# Altium PCB BOARD_4LAYER.PcbDoc (part 19 of 21)
Units mil, origin at the board's own origin, x right, y up, seen from the top; angles counter-clockwise.
Board outline 6692.91 x 10039.37 mil, 4 copper layers (Top Layer, Mid Layer 1, Mid Layer 2, Bottom Layer), stack 66.299 mil thick; 1532 components, 908 nets, 4105 pads, 1286 vias.
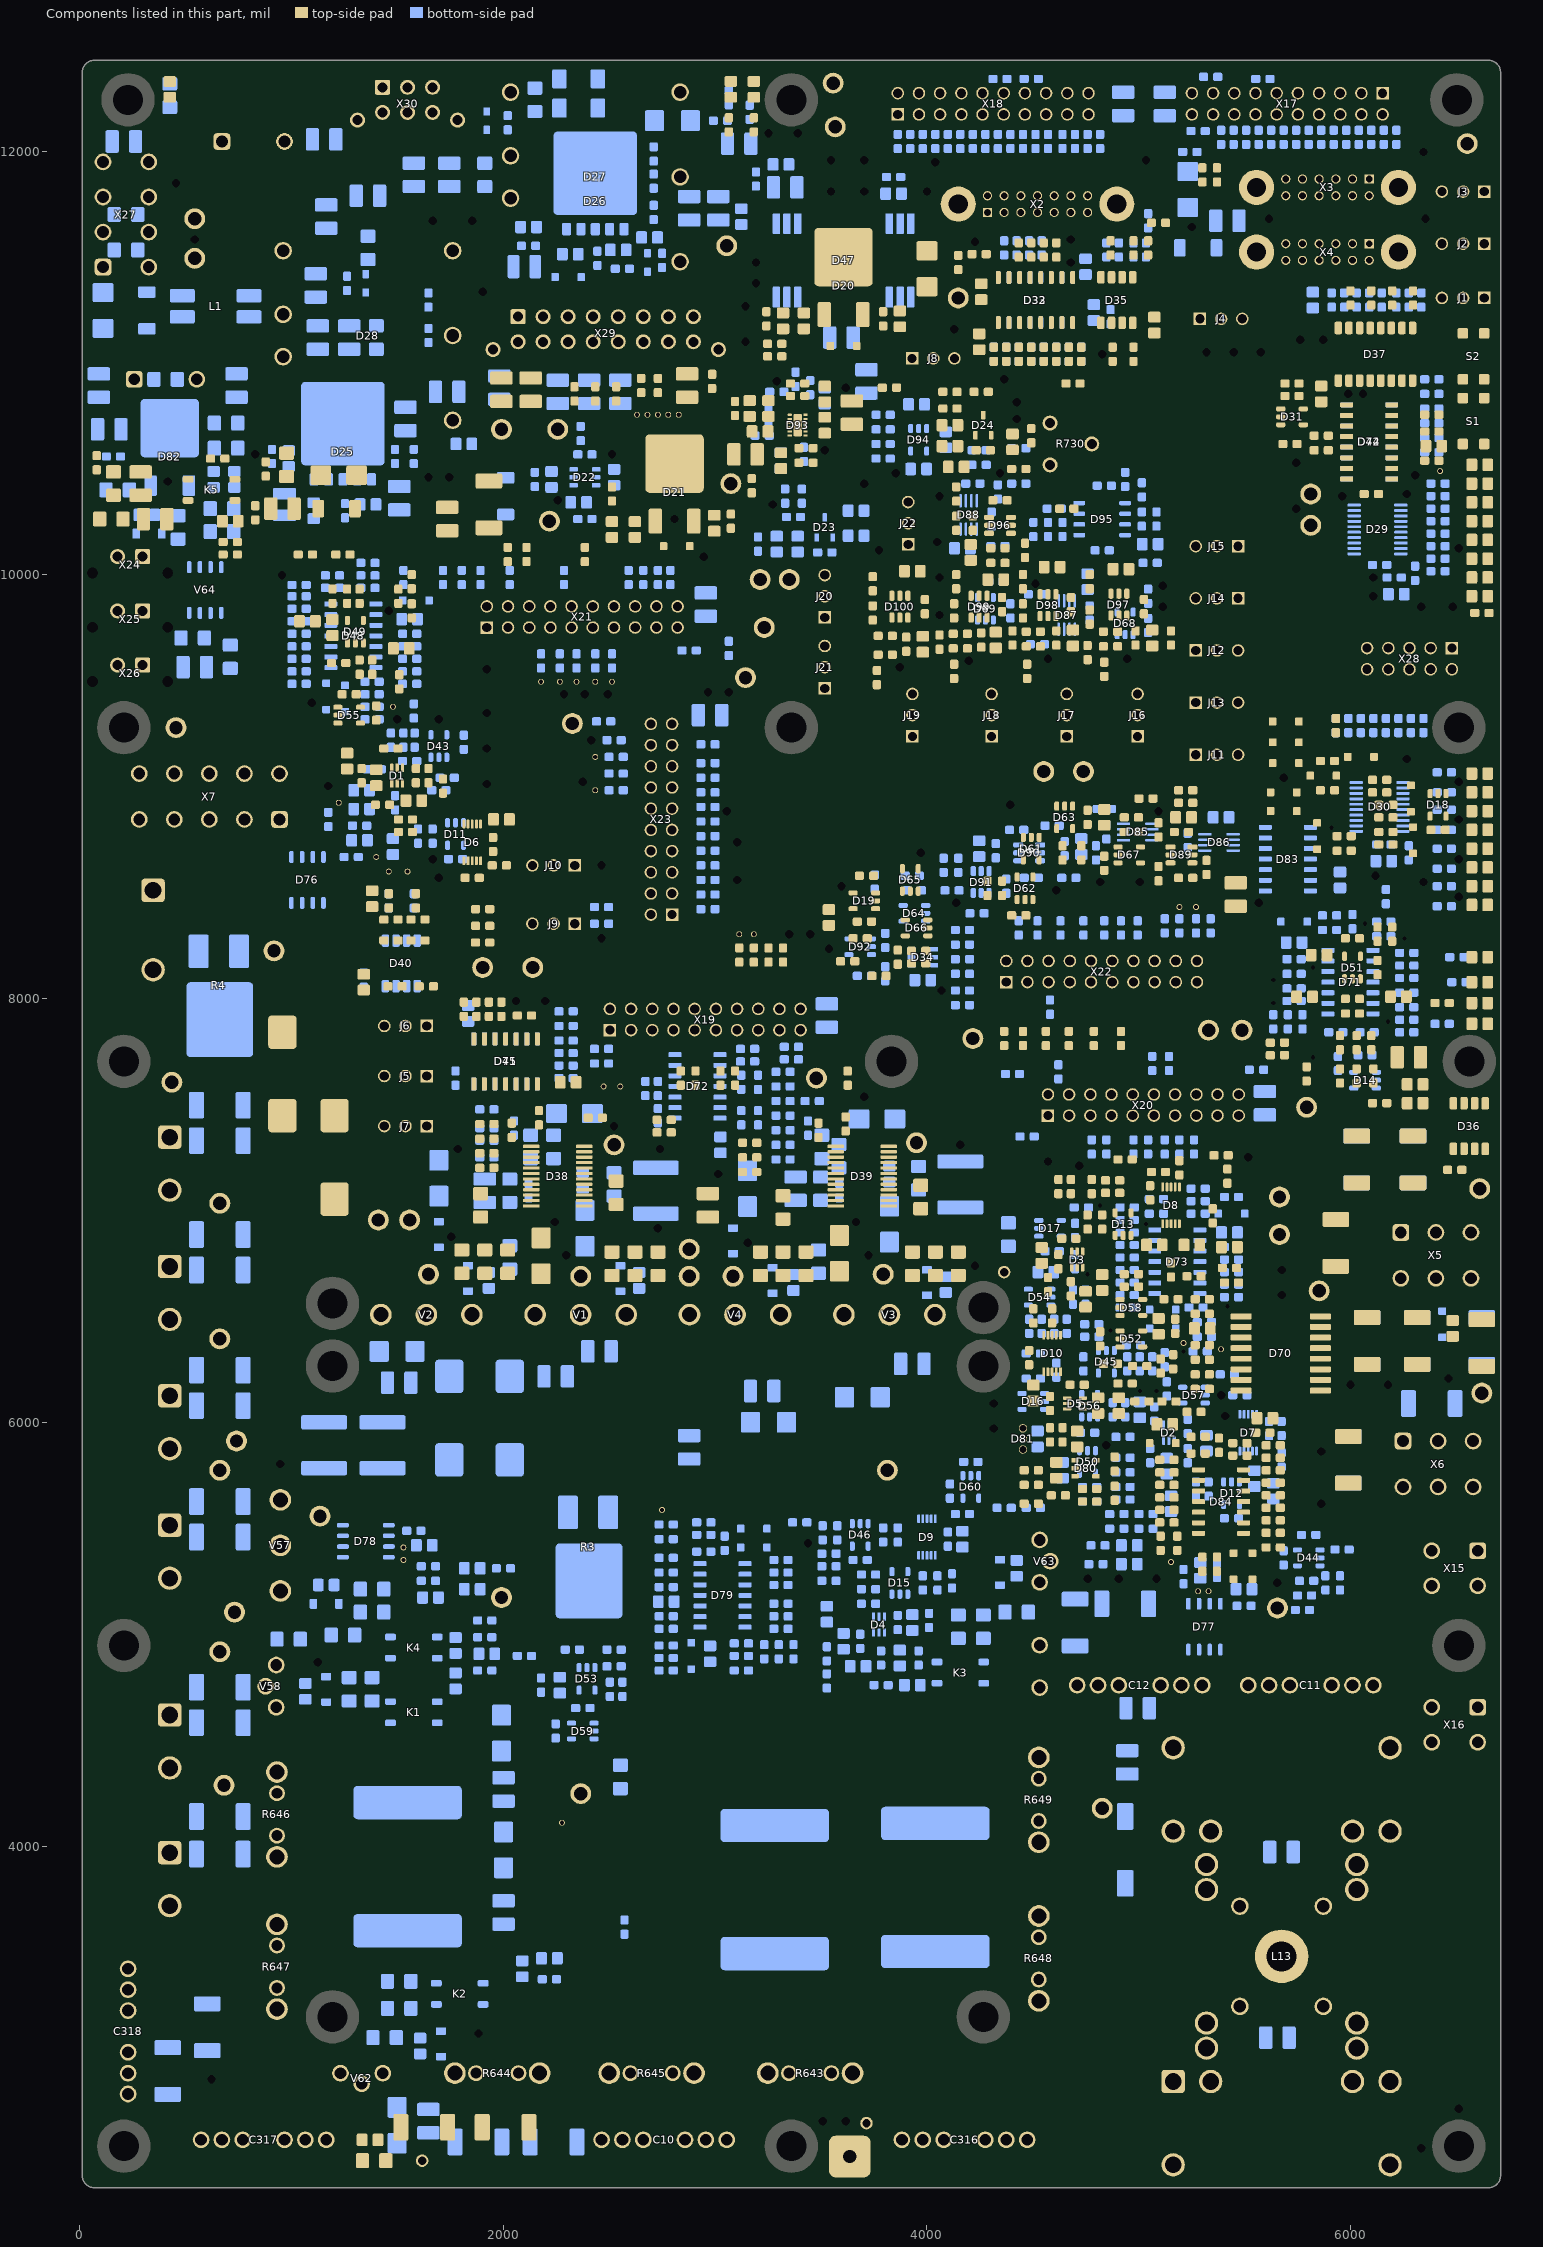
[diagram p21: the components of this part, seen from the top]

## Polygon pours and split planes (outlines as drawn) (continued)
$2N2408 on Mid Layer 2 "$2N2408_L-01_P176" (solid, remove dead copper, pour order 176): 3891.73,5706.69 2592.52,5706.69 2592.52,5500 2405.51,5500 2405.51,5706.69 2297.24,5706.69 2297.24,6612.2 2435.04,6612.2 2435.04,5844.49 3763.78,5844.49 3763.78,6612.2 3891.73,6612.2
$2N2408 on Mid Layer 2 "$2N2408_L-01_P168" (solid, remove dead copper, pour order 168): 3744.09,6612.2 3842.52,6612.2 3842.52,6700.79 3744.09,6700.79
$2N2408 on Mid Layer 2 "$2N2408_L-01_P164" (solid, remove dead copper, pour order 164): 3842.52,6661.42 3891.73,6612.2 3842.52,6612.2
$2N2408 on Mid Layer 2 "$2N2408_L-01_P163" (solid, remove dead copper, pour order 163): 3744.09,6612.2 3763.78,6592.52 3763.78,6612.2
U_TS on Mid Layer 2 "U_TS_L-01_P155" (solid, remove dead copper, pour order 155): 6175.2,5637.8 6332.68,5637.8 6332.68,5933.07 6175.2,5933.07
U_TS on Mid Layer 2 "U_TS_L-01_P150" (solid, remove dead copper, pour order 150): 5761.81,6070.87 5919.29,6070.87 5919.29,6307.09 5761.81,6307.09
U_Fin on Mid Layer 2 "U_FIN_L-01_P147" (solid, remove dead copper, pour order 147): 6155.51,6661.42 6312.99,6661.42 6312.99,7015.75 6155.51,7015.75
U_Fin on Mid Layer 2 "U_FIN_L-01_P141" (solid, remove dead copper, pour order 141): 5919.29,6346.46 5761.81,6346.46 5761.81,6681.1 5860.24,6779.53 5919.29,6779.53
U_Fin on Mid Layer 2 "U_FIN_L-01_P140" (solid, remove dead copper, pour order 140): 5919.29,6661.42 6155.51,6661.42 6155.51,6779.53 5919.29,6779.53
~U_TS on Mid Layer 2 "~U_TS_L-01_P134" (solid, remove dead copper, pour order 134): 6529.53,5637.8 6687.01,5637.8 6687.01,6287.4 6529.53,6287.4
~U_Fin on Mid Layer 2 "~U_FIN_L-01_P130" (solid, remove dead copper, pour order 130): 6509.84,6464.57 6687.01,6464.57 6687.01,7212.6 6509.84,7212.6
+U_POWER on Mid Layer 2 "+U_POWER_L-01_P128" (solid, remove dead copper, pour order 128): 614.17,5027.56 801.18,5027.56 801.18,7576.77 614.17,7576.77
+U_POWER on Mid Layer 2 "+U_POWER_L-01_P124" (solid, remove dead copper, pour order 124): 1273.62,4003.94 1844.49,4003.94 1844.49,4338.58 1273.62,4338.58
$6N134 on Mid Layer 2 "$6N134_L-01_P117" (solid, remove dead copper, pour order 117): 1372.05,2744.09 860.24,2744.09 860.24,3393.7 1017.72,3393.7 1017.72,2842.52 1372.05,2842.52
$6N134 on Mid Layer 2 "$6N134_L-01_P114" (solid, remove dead copper, pour order 114): 643.7,3846.46 978.35,3846.46 978.35,4122.05 643.7,4122.05
$6N134 on Mid Layer 2 "$6N134_L-01_P113" (solid, remove dead copper, pour order 113): 643.7,3216.54 761.81,3216.54 761.81,3846.46 643.7,3846.46
$6N134 on Mid Layer 2 "$6N134_L-01_P112" (solid, remove dead copper, pour order 112): 761.81,3216.54 860.24,3216.54 860.24,3393.7 761.81,3393.7
$6N135 on Mid Layer 2 "$6N135_L-01_P104" (solid, remove dead copper, pour order 104): 2326.77,3708.66 2435.04,3708.66 2435.04,3944.88 2326.77,3944.88
$6N135 on Mid Layer 2 "$6N135_L-01_P101" (solid, remove dead copper, pour order 101): 1175.2,3472.44 860.24,3472.44 860.24,3748.03 1057.09,3748.03 1057.09,4200.79 801.18,4200.79 801.18,4338.58 653.54,4486.22 653.54,4811.02 919.29,4811.02 919.29,4712.6 840.55,4712.6 840.55,4476.38 1175.2,4476.38
$6N135 on Mid Layer 2 "$6N135_L-01_P096" (solid, remove dead copper, pour order 96): 1175.2,3472.44 1844.49,3472.44 1844.49,3846.46 1175.2,3846.46
$6N3156 on Mid Layer 2 "$6N3156_L-01_P081" (solid, remove dead copper, pour order 81): 3616.14,3885.83 2927.17,3885.83 2927.17,3059.06 3025.59,3059.06 3025.59,2862.2 2750,2862.2 2750,3925.2 3064.96,4240.16 3616.14,4240.16
$6N3156 on Mid Layer 2 "$6N3156_L-01_P077" (solid, remove dead copper, pour order 77): 2927.17,3059.06 3734.25,3059.06 3734.25,3118.11 2927.17,3118.11
$6N3156 on Mid Layer 2 "$6N3156_L-01_P073" (solid, remove dead copper, pour order 73): 2021.65,2881.89 2277.56,2881.89 2277.56,3137.8 2021.65,3137.8
$6N3156 on Mid Layer 2 "$6N3156_L-01_P070" (solid, remove dead copper, pour order 70): 3498.03,2842.52 3734.25,2842.52 3734.25,3059.06 3498.03,3059.06
$6N3156 on Mid Layer 2 "$6N3156_L-01_P067" (solid, remove dead copper, pour order 67): 2750,3137.8 2021.65,3137.8 2120.08,3236.22 2750,3236.22
$6N106 on Mid Layer 2 "$6N106_L-01_P065" (solid, remove dead copper, pour order 65): 18 vertices, not listed, extent 1411.42,2566.93 3399.61,3059.06
$6N106 on Mid Layer 2 "$6N106_L-01_P055" (solid, remove dead copper, pour order 55): 929.13,4604.33 1096.46,4604.33 1096.46,4712.6 929.13,4712.6
$6N3315 on Mid Layer 2 "$6N3315_L-01_P050" (solid, remove dead copper, pour order 50): 21 vertices, not listed, extent 4364.17,3196.85 4718.5,5401.57
+U_AMP on Mid Layer 2 "+U_AMP_L-01_P042" (solid, remove dead copper, pour order 42): 6293.31,4633.86 6687.01,4633.86 6687.01,4771.65 6293.31,4771.65
+U_AMP on Mid Layer 2 "+U_AMP_L-01_P039" (solid, remove dead copper, pour order 39): 6175.2,5362.2 6687.01,5362.2 6687.01,5480.31 6175.2,5480.31
$6N94 on Mid Layer 2 "$6N94_L-01_P034" (solid, remove dead copper, pour order 34): 5564.96,2842.52 4856.3,2842.52 4856.3,3472.44 5427.17,3472.44 5427.17,3314.96 5564.96,3314.96
$6N94 on Mid Layer 2 "$6N94_L-01_P030" (solid, remove dead copper, pour order 30): 4127.95,2409.45 3812.99,2409.45 3812.99,3196.85 3025.59,3196.85 3025.59,3688.98 3616.14,3688.98 3616.14,3295.28 3911.42,3295.28 3911.42,2763.78 4127.95,2763.78
$6N101 on Mid Layer 2 "$6N101_L-01_P026" (solid, remove dead copper, pour order 26): 5722.44,4673.23 5584.65,4535.43 5584.65,3669.29 5486.22,3669.29 5486.22,3590.55 4856.3,3590.55 4856.3,3925.2 5072.83,3925.2 5072.83,4555.12 5427.17,4555.12 5427.17,4771.65 5722.44,4771.65
$6N737 on Mid Layer 2 "$6N737_L-01_P019" (solid, remove dead copper, pour order 19): 6687.01,2803.15 6293.31,2803.15 6293.31,2409.45 5742.13,2409.45 5742.13,3295.28 5879.92,3295.28 5879.92,3472.44 6687.01,3472.44
$6N737 on Mid Layer 2 "$6N737_L-01_P015" (solid, remove dead copper, pour order 15): 4777.56,2507.87 4226.38,2507.87 4226.38,2842.52 3990.16,2842.52 3990.16,3374.02 3753.94,3374.02 3753.94,3629.92 4324.8,3629.92 4324.8,3374.02 4088.58,3374.02 4088.58,2980.32 4777.56,2980.32
-U_AMP on Mid Layer 2 "-U_AMP_L-01_P010" (solid, remove dead copper, pour order 10): 6687.01,3590.55 5879.92,3590.55 5879.92,3669.29 5761.81,3669.29 5761.81,4437.01 5840.55,4515.75 5840.55,4771.65 6135.83,4771.65 6135.83,4515.75 6687.01,4515.75
-U_AMP on Mid Layer 2 "-U_AMP_L-01_P002" (solid, remove dead copper, pour order 2): 6312.99,5125.98 6687.01,5125.98 6687.01,5263.78 6312.99,5263.78
$2N5063 on Top Layer "$2N5063_L01_P642" (solid, remove dead copper, pour order 642): 2356.3,4131.89 2917.32,4692.91 2356.3,4692.91
$2N5063 on Top Layer "$2N5063_L01_P641" (solid, remove dead copper, pour order 641): 29 vertices, not listed, extent 1411.42,4082.68 4413.39,6110.24
$2N5063 on Top Layer "$2N5063_L01_P640" (solid, remove dead copper, pour order 640): 2169.29,3649.61 2267.72,3649.61 2267.72,4082.68 2169.29,4082.68
$2N5063 on Top Layer "$2N5063_L01_P639" (solid, remove dead copper, pour order 639): 2169.29,3226.38 2474.41,3226.38 2474.41,3649.61 2169.29,3649.61
GND_UM on Top Layer "GND_UM_L01_P638" (solid, remove dead copper, pour order 638): 4728.35,10076.77 5151.57,10076.77 5151.57,10578.74 4728.35,10578.74
GND_UM on Top Layer "GND_UM_L01_P637" (solid, remove dead copper, pour order 637): 3812.99,11316.93 3921.26,11316.93 3921.26,11838.58 3812.99,11838.58
GND_UM on Top Layer "GND_UM_L01_P633" (solid, remove dead copper, pour order 633): 5653.54,11602.36 6293.31,11602.36 6293.31,11750 5653.54,11750
GND_UM on Top Layer "GND_UM_L01_P632" (solid, remove dead copper, pour order 632): 5072.83,11336.61 5171.26,11336.61 5171.26,11622.05 5072.83,11622.05
GND_UM on Top Layer "GND_UM_L01_P631" (solid, remove dead copper, pour order 631): 5653.54,11149.61 5909.45,11149.61 5909.45,11444.88 5653.54,11444.88
GND_UM on Top Layer "GND_UM_L01_P630" (solid, remove dead copper, pour order 630): 5259.84,11730.32 5417.32,11730.32 5417.32,11779.53 5259.84,11779.53
GND_UM on Top Layer "GND_UM_L01_P629" (solid, remove dead copper, pour order 629): 5417.32,11730.32 5653.54,11730.32 5653.54,11907.48 5417.32,11907.48
GND_UM on Top Layer "GND_UM_L01_P628" (solid, remove dead copper, pour order 628): 5171.26,11336.61 5653.54,11336.61 5653.54,11730.32 5171.26,11730.32
GND_UM on Top Layer "GND_UM_L01_P627" (solid, remove dead copper, pour order 627): 5200.79,11730.32 5259.84,11730.32 5259.84,11956.69 5200.79,11956.69
GND_UM on Top Layer "GND_UM_L01_P626" (solid, remove dead copper, pour order 626): 5417.32,11907.48 6244.09,11907.48 6244.09,11956.69 5417.32,11956.69
GND_UM on Top Layer "GND_UM_L01_P625" (solid, remove dead copper, pour order 625): 5200.79,11956.69 6244.09,11956.69 6244.09,12114.17 5200.79,12114.17
GND_UM on Top Layer "GND_UM_L01_P624" (solid, remove dead copper, pour order 624): 3921.26,11602.36 4246.06,11602.36 4246.06,11838.58 3921.26,11838.58
GND_UM on Top Layer "GND_UM_L01_P623" (solid, remove dead copper, pour order 623): 3812.99,11838.58 4816.93,11838.58 4816.93,12104.33 3812.99,12104.33
GND_UM on Top Layer "GND_UM_L01_P622" (solid, remove dead copper, pour order 622): 4816.93,11730.32 5200.79,11730.32 5200.79,12232.28 4816.93,12232.28
GND_UM on Top Layer "GND_UM_L01_P621" (solid, remove dead copper, pour order 621): 4718.5,12232.28 5200.79,12232.28 5200.79,12340.55 4718.5,12340.55
GND_UM on Top Layer "GND_UM_L01_P620" (solid, remove dead copper, pour order 620): 3803.15,12340.55 6244.09,12340.55 6244.09,12389.76 3803.15,12389.76
GND_UM on Top Layer "GND_UM_L01_P603" (solid, remove dead copper, pour order 603): 6244.09,11907.48 6687.01,11907.48 6687.01,12389.76 6244.09,12389.76
GND_UM on Top Layer "GND_UM_L01_P600" (solid, remove dead copper, pour order 600): 3488.19,11316.93 3812.99,11316.93 3812.99,12389.76 3488.19,12389.76
GND_UM on Top Layer "GND_UM_L01_P599" (solid, remove dead copper, pour order 599): 3448.82,11316.93 3488.19,11316.93 3488.19,11661.42 3448.82,11661.42
$4N2819 on Top Layer "$4N2819_L01_P592" (solid, remove dead copper, pour order 592): 1972.44,11868.11 2120.08,11868.11 2120.08,12084.65 1972.44,12084.65
$4N2811 on Top Layer "$4N2811_L01_P586" (solid, remove dead copper, pour order 586): 1155.51,11838.58 1942.91,11838.58 1942.91,12084.65 1155.51,12084.65
$4N2811 on Top Layer "$4N2811_L01_P585" (solid, remove dead copper, pour order 585): 1155.51,11720.47 2120.08,11720.47 2120.08,11838.58 1155.51,11838.58
$4N2807 on Top Layer "$4N2807_L01_P577" (solid, remove dead copper, pour order 577): 899.61,11169.29 1066.93,11169.29 1066.93,11277.56 899.61,11277.56
$4N2806 on Top Layer "$4N2806_L01_P576" (solid, remove dead copper, pour order 576): 1559.06,10972.44 899.61,10972.44 899.61,11149.61 1086.61,11149.61 1086.61,11297.24 899.61,11297.24 899.61,11671.26 1559.06,11671.26
$4N2806 on Top Layer "$4N2806_L01_P570" (solid, remove dead copper, pour order 570): 899.61,10972.44 1047.24,10972.44 1047.24,11090.55 899.61,11090.55
$4N4014 on Top Layer "$4N4014_L01_P565" (solid, remove dead copper, pour order 565): 427.17,9761.81 683.07,9761.81 683.07,9899.61 427.17,9899.61
$4N4014 on Top Layer "$4N4014_L01_P562" (solid, remove dead copper, pour order 562): 535.43,9496.06 250,9496.06 250,9692.91 427.17,9692.91 427.17,9761.81 535.43,9761.81
$4N4005 on Top Layer "$4N4005_L01_P558" (solid, remove dead copper, pour order 558): 250,9742.13 397.64,9742.13 397.64,10175.2 250,10175.2
$4N4005 on Top Layer "$4N4005_L01_P554" (solid, remove dead copper, pour order 554): 397.64,9948.82 624.02,9948.82 624.02,10244.09 397.64,10244.09
$4N4008 on Top Layer "$4N4008_L01_P551" (solid, remove dead copper, pour order 551): 43.31,10549.21 574.8,10549.21 574.8,10834.65 43.31,10834.65
$4N4016 on Top Layer "$4N4016_L01_P548" (solid, remove dead copper, pour order 548): 33.46,9486.22 220.47,9486.22 220.47,10175.2 33.46,10175.2
$4N4016 on Top Layer "$4N4016_L01_P547" (solid, remove dead copper, pour order 547): 33.46,10175.2 122.05,10175.2 122.05,10411.42 33.46,10411.42
$4N4016 on Top Layer "$4N4016_L01_P537" (solid, remove dead copper, pour order 537): 555.12,9496.06 683.07,9496.06 683.07,9742.13 555.12,9742.13
-U_VENT on Top Layer "-U_VENT_L01_P535" (solid, remove dead copper, pour order 535): 1037.4,11710.63 1125.98,11710.63 1125.98,12114.17 1037.4,12114.17
-U_VENT on Top Layer "-U_VENT_L01_P534" (solid, remove dead copper, pour order 534): 1037.4,11710.63 860.24,11710.63 860.24,10864.17 417.32,10864.17 417.32,10992.13 761.81,10992.13 761.81,12232.28 1037.4,12232.28
-U_VENT on Top Layer "-U_VENT_L01_P528" (solid, remove dead copper, pour order 528): 1037.4,12114.17 1726.38,12114.17 1726.38,12232.28 1037.4,12232.28
+U_VENT on Top Layer "+U_VENT_L01_P510" (solid, remove dead copper, pour order 510): 732.28,12261.81 1726.38,12261.81 1726.38,12389.76 732.28,12389.76
+U_VENT on Top Layer "+U_VENT_L01_P509" (solid, remove dead copper, pour order 509): 732.28,11021.65 387.8,11021.65 387.8,10864.17 43.31,10864.17 43.31,11070.87 624.02,11070.87 624.02,11838.58 515.75,11838.58 515.75,12389.76 732.28,12389.76
$4N2816 on Top Layer "$4N2816_L01_P499" (solid, remove dead copper, pour order 499): 43.31,11090.55 594.49,11090.55 594.49,11267.72 43.31,11267.72
-U_UM on Top Layer "-U_UM_L01_P495" (solid, remove dead copper, pour order 495): 250,11307.09 417.32,11307.09 417.32,12094.49 250,12094.49
+U_UM on Top Layer "+U_UM_L01_P489" (solid, remove dead copper, pour order 489): 43.31,11287.4 190.94,11287.4 190.94,12094.49 43.31,12094.49
+15V on Top Layer "+15V_L01_P481" (solid, remove dead copper, pour order 481): 3527.56,7409.45 3576.77,7409.45 3576.77,7478.35 3527.56,7478.35
+15V on Top Layer "+15V_L01_P477" (solid, remove dead copper, pour order 477): 2080.71,7438.98 2129.92,7438.98 2129.92,7517.72 2080.71,7517.72
GND on Top Layer "GND_L01_P469" (solid, remove dead copper, pour order 469): 4059.06,7468.5 4206.69,7320.87 4206.69,7468.5
GND on Top Layer "GND_L01_P448" (solid, remove dead copper, pour order 448): 5574.8,5047.24 6066.93,5047.24 6066.93,5539.37 5574.8,5539.37
GND on Top Layer "GND_L01_P447" (solid, remove dead copper, pour order 447): 5496.06,6779.53 5722.44,6779.53 5722.44,7153.54 5496.06,7153.54
GND on Top Layer "GND_L01_P446" (solid, remove dead copper, pour order 446): 4206.69,6897.64 4580.71,6897.64 4580.71,7704.72 4206.69,7704.72
GND on Top Layer "GND_L01_P445" (solid, remove dead copper, pour order 445): 4275.59,6671.26 4482.28,6671.26 4482.28,6897.64 4275.59,6897.64
GND on Top Layer "GND_L01_P444" (solid, remove dead copper, pour order 444): 3655.51,7468.5 4275.59,7468.5 4275.59,7881.89 3655.51,7881.89
GND on Top Layer "GND_L01_P443" (solid, remove dead copper, pour order 443): 3379.92,7881.89 4275.59,7881.89 4275.59,8078.74 3379.92,8078.74
GND on Top Layer "GND_L01_P442" (solid, remove dead copper, pour order 442): 3419.29,8708.66 4314.96,8708.66 4314.96,8944.88 3419.29,8944.88
GND on Top Layer "GND_L01_P441" (solid, remove dead copper, pour order 441): 4531.5,8255.91 5250,8255.91 5250,8570.87 4531.5,8570.87
GND on Top Layer "GND_L01_P440" (solid, remove dead copper, pour order 440): 5692.91,8334.65 6086.61,8334.65 6086.61,8492.13 5692.91,8492.13
GND on Top Layer "GND_L01_P439" (solid, remove dead copper, pour order 439): 5230.31,7763.78 5564.96,7763.78 5564.96,8019.69 5230.31,8019.69
GND on Top Layer "GND_L01_P438" (solid, remove dead copper, pour order 438): 5230.31,8147.64 5348.43,8147.64 5348.43,8364.17 5230.31,8364.17
GND on Top Layer "GND_L01_P437" (solid, remove dead copper, pour order 437): 5348.43,7950.79 5692.91,7950.79 5692.91,8364.17 5348.43,8364.17
GND on Top Layer "GND_L01_P436" (solid, remove dead copper, pour order 436): 4836.61,10608.27 5190.94,10608.27 5190.94,10942.91 4836.61,10942.91
GND on Top Layer "GND_L01_P435" (solid, remove dead copper, pour order 435): 6381.89,9102.36 6687.01,9102.36 6687.01,9279.53 6381.89,9279.53
GND on Top Layer "GND_L01_P434" (solid, remove dead copper, pour order 434): 6106.3,9279.53 6696.85,9279.53 6696.85,9505.91 6106.3,9505.91
GND on Top Layer "GND_L01_P433" (solid, remove dead copper, pour order 433): 6372.05,10332.68 6480.31,10332.68 6480.31,10490.16 6372.05,10490.16
GND on Top Layer "GND_L01_P432" (solid, remove dead copper, pour order 432): 5988.19,9732.28 6480.31,9732.28 6480.31,10332.68 5988.19,10332.68
GND on Top Layer "GND_L01_P431" (solid, remove dead copper, pour order 431): 5988.19,9358.27 6106.3,9358.27 6106.3,9594.49 5988.19,9594.49
GND on Top Layer "GND_L01_P430" (solid, remove dead copper, pour order 430): 5624.02,10194.88 5988.19,10194.88 5988.19,10421.26 5624.02,10421.26
GND on Top Layer "GND_L01_P429" (solid, remove dead copper, pour order 429): 5545.28,9358.27 5988.19,9358.27 5988.19,10194.88 5545.28,10194.88
GND on Top Layer "GND_L01_P428" (solid, remove dead copper, pour order 428): 5417.32,10194.88 5624.02,10194.88 5624.02,10824.8 5417.32,10824.8
GND on Top Layer "GND_L01_P427" (solid, remove dead copper, pour order 427): 5417.32,10824.8 5624.02,10824.8 5624.02,11129.92 5417.32,11129.92
GND on Top Layer "GND_L01_P426" (solid, remove dead copper, pour order 426): 5190.94,11129.92 5240.16,11129.92 5240.16,11307.09 5190.94,11307.09
GND on Top Layer "GND_L01_P425" (solid, remove dead copper, pour order 425): 5348.43,11129.92 5624.02,11129.92 5624.02,11307.09 5348.43,11307.09
GND on Top Layer "GND_L01_P424" (solid, remove dead copper, pour order 424): 5190.94,9102.36 5417.32,9102.36 5417.32,11129.92 5190.94,11129.92
GND on Top Layer "GND_L01_P423" (solid, remove dead copper, pour order 423): 2129.92,8216.54 2887.8,8216.54 2887.8,8295.28 2129.92,8295.28
GND on Top Layer "GND_L01_P422" (solid, remove dead copper, pour order 422): 2887.8,8216.54 3419.29,8216.54 3419.29,9397.64 2887.8,9397.64
GND on Top Layer "GND_L01_P421" (solid, remove dead copper, pour order 421): 1775.59,8088.58 3064.96,8088.58 3064.96,8216.54 1775.59,8216.54
GND on Top Layer "GND_L01_P420" (solid, remove dead copper, pour order 420): 3409.45,9151.57 3665.35,9151.57 3665.35,9397.64 3409.45,9397.64
GND on Top Layer "GND_L01_P419" (solid, remove dead copper, pour order 419): 3409.45,8944.88 4925.2,8944.88 4925.2,9151.57 3409.45,9151.57
GND on Top Layer "GND_L01_P418" (solid, remove dead copper, pour order 418): 1765.75,8895.67 2011.81,8895.67 2011.81,9122.05 1765.75,9122.05
GND on Top Layer "GND_L01_P417" (solid, remove dead copper, pour order 417): 2011.81,8777.56 2622.05,8777.56 2622.05,9122.05 2011.81,9122.05
GND on Top Layer "GND_L01_P416" (solid, remove dead copper, pour order 416): 2789.37,9397.64 2622.05,9397.64 2622.05,9122.05 1578.74,9122.05 1578.74,9663.39 2789.37,9663.39
GND on Top Layer "GND_L01_P415" (solid, remove dead copper, pour order 415): 1618.11,9663.39 1834.65,9663.39 1834.65,10037.4 1618.11,10037.4
GND on Top Layer "GND_L01_P414" (solid, remove dead copper, pour order 414): 2789.37,9397.64 3419.29,9397.64 3419.29,9870.08 2789.37,9870.08
GND on Top Layer "GND_L01_P413" (solid, remove dead copper, pour order 413): 2789.37,9870.08 3448.82,9870.08 3448.82,10037.4 2789.37,10037.4
GND on Top Layer "GND_L01_P412" (solid, remove dead copper, pour order 412): 801.18,9269.68 1057.09,9269.68 1057.09,10066.93 801.18,10066.93
GND on Top Layer "GND_L01_P411" (solid, remove dead copper, pour order 411): 1381.89,10204.72 1559.06,10204.72 1559.06,10519.68 1381.89,10519.68
GND on Top Layer "GND_L01_P410" (solid, remove dead copper, pour order 410): 2001.97,10391.73 2169.29,10391.73 2169.29,10509.84 2001.97,10509.84
GND on Top Layer "GND_L01_P409" (solid, remove dead copper, pour order 409): 2169.29,10342.52 2356.3,10342.52 2356.3,10608.27 2169.29,10608.27
GND on Top Layer "GND_L01_P408" (solid, remove dead copper, pour order 408): 1037.4,10519.68 1598.43,10519.68 1598.43,10627.95 1037.4,10627.95
GND on Top Layer "GND_L01_P407" (solid, remove dead copper, pour order 407): 899.61,10627.95 1598.43,10627.95 1598.43,10942.91 899.61,10942.91
GND on Top Layer "GND_L01_P406" (solid, remove dead copper, pour order 406): 1864.17,11366.14 3232.28,11366.14 3232.28,11435.04 1864.17,11435.04
GND on Top Layer "GND_L01_P405" (solid, remove dead copper, pour order 405): 1598.43,10588.58 1864.17,10588.58 1864.17,11435.04 1598.43,11435.04
GND on Top Layer "GND_L01_P404" (solid, remove dead copper, pour order 404): 1598.43,11435.04 2169.29,11435.04 2169.29,11671.26 1598.43,11671.26
GND on Top Layer "GND_L01_P403" (solid, remove dead copper, pour order 403): 2720.47,11435.04 3232.28,11435.04 3232.28,11937.01 2720.47,11937.01
GND on Top Layer "GND_L01_P402" (solid, remove dead copper, pour order 402): 3025.59,11937.01 3232.28,11937.01 3232.28,12035.43 3025.59,12035.43
GND on Top Layer "GND_L01_P401" (solid, remove dead copper, pour order 401): 3232.28,11366.14 3419.29,11366.14 3419.29,12389.76 3232.28,12389.76
GND on Top Layer "GND_L01_P400" (solid, remove dead copper, pour order 400): 2720.47,11937.01 3025.59,11937.01 3025.59,12389.76 2720.47,12389.76
GND on Top Layer "GND_L01_P399" (solid, remove dead copper, pour order 399): 2169.29,11435.04 2720.47,11435.04 2720.47,12389.76 2169.29,12389.76
GND on Top Layer "GND_L01_P396" (solid, remove dead copper, pour order 396): 2188.98,7124.02 2257.87,7124.02 2257.87,7183.07 2188.98,7183.07
GND on Top Layer "GND_L01_P395" (solid, remove dead copper, pour order 395): 3625.98,7124.02 3694.88,7124.02 3694.88,7183.07 3625.98,7183.07
$2N3778 on Top Layer "$2N3778_L01_P389" (solid, remove dead copper, pour order 389): 3625.98,7025.59 3694.88,7025.59 3694.88,7104.33 3625.98,7104.33
$2N3800 on Top Layer "$2N3800_L01_P385" (solid, remove dead copper, pour order 385): 2188.98,7025.59 2257.87,7025.59 2257.87,7104.33 2188.98,7104.33
UL on Top Layer "UL_L01_P379" (solid, remove dead copper, pour order 379): 2996.06,5913.39 3192.91,5913.39 3192.91,6090.55 2996.06,6090.55
UL on Top Layer "UL_L01_P378" (solid, remove dead copper, pour order 378): 2021.65,5913.39 2710.63,5913.39 2710.63,6090.55 2021.65,6090.55
UL on Top Layer "UL_L01_P370" (solid, remove dead copper, pour order 370): 673.23,8137.8 889.76,8137.8 889.76,8334.65 673.23,8334.65
UL on Top Layer "UL_L01_P369" (solid, remove dead copper, pour order 369): 889.76,7763.78 1007.87,7763.78 1007.87,8334.65 889.76,8334.65
UL on Top Layer "UL_L01_P368" (solid, remove dead copper, pour order 368): 3931.1,6917.32 4009.84,6917.32 4009.84,7015.75 3931.1,7015.75
UL on Top Layer "UL_L01_P366" (solid, remove dead copper, pour order 366): 3025.59,6612.2 3133.86,6612.2 3133.86,6690.94 3025.59,6690.94
UL on Top Layer "UL_L01_P362" (solid, remove dead copper, pour order 362): 3665.35,6316.93 3025.59,6316.93 3025.59,6612.2 3133.86,6612.2 3163.39,6582.68 3163.39,6366.14 3527.56,6366.14 3527.56,6612.2 3665.35,6612.2
~U_TP on Top Layer "~U_TP_L01_P357" (solid, remove dead copper, pour order 357): 958.66,9013.78 141.73,9013.78 141.73,8334.65 653.54,8334.65 653.54,8137.8 417.32,8137.8 417.32,8059.06 53.15,8059.06 53.15,8334.65 43.31,8334.65 43.31,9112.2 958.66,9112.2
U_TP on Top Layer "U_TP_L01_P354" (solid, remove dead copper, pour order 354): 1066.93,8433.07 230.31,8433.07 230.31,8895.67 998.03,8895.67 998.03,8797.24 850.39,8797.24 850.39,8511.81 1066.93,8511.81
$2N2430 on Top Layer "$2N2430_L01_P348" (solid, remove dead copper, pour order 348): 1559.06,5716.54 1647.64,5716.54 1647.64,5854.33 1559.06,5854.33
U_MOST on Top Layer "U_MOST_L01_P343" (solid, remove dead copper, pour order 343): 1096.46,5529.53 1283.46,5529.53 1283.46,5627.95 1096.46,5627.95
U_MOST on Top Layer "U_MOST_L01_P342" (solid, remove dead copper, pour order 342): 2169.29,5490.16 2248.03,5490.16 2248.03,5696.85 2169.29,5696.85
I_MOST on Top Layer "I_MOST_L01_P334" (solid, remove dead copper, pour order 334): 1125.98,5322.83 1204.72,5322.83 1204.72,5460.63 1125.98,5460.63
I_MOST on Top Layer "I_MOST_L01_P333" (solid, remove dead copper, pour order 333): 1037.4,5332.68 889.76,5332.68 889.76,5490.16 1007.87,5490.16 1037.4,5460.63
UH on Top Layer "UH_L01_P330" (solid, remove dead copper, pour order 330): 2494.09,6907.48 2572.83,6907.48 2572.83,7005.91 2494.09,7005.91
UH on Top Layer "UH_L01_P328" (solid, remove dead copper, pour order 328): 1086.61,8177.17 1214.57,8177.17 1214.57,8383.86 1086.61,8383.86
UH on Top Layer "UH_L01_P326" (solid, remove dead copper, pour order 326): 1086.61,6917.32 1214.57,6917.32 1214.57,7192.91 1086.61,7192.91
UH on Top Layer "UH_L01_P321" (solid, remove dead copper, pour order 321): 2208.66,6326.77 1588.58,6326.77 1588.58,6612.2 1706.69,6612.2 1706.69,6366.14 2070.87,6366.14 2070.87,6612.2 2208.66,6612.2
PGND on Top Layer "PGND_L01_P311" (solid, remove dead copper, pour order 311): 3773.62,4309.06 3025.59,4309.06 2671.26,3954.72 2671.26,3196.85 2503.94,3196.85 2503.94,3944.88 3015.75,4456.69 3773.62,4456.69
PGND on Top Layer "PGND_L01_P303" (solid, remove dead copper, pour order 303): 1854.33,6877.95 1933.07,6877.95 1933.07,6976.38 1854.33,6976.38
PGND on Top Layer "PGND_L01_P301" (solid, remove dead copper, pour order 301): 1470.47,6877.95 1637.8,6877.95 1637.8,7055.12 1470.47,7055.12
PGND on Top Layer "PGND_L01_P300" (solid, remove dead copper, pour order 300): 1372.05,6799.21 1470.47,6799.21 1470.47,7055.12 1372.05,7055.12
PGND on Top Layer "PGND_L01_P299" (solid, remove dead copper, pour order 299): 594.49,7212.6 820.87,7212.6 820.87,7724.41 594.49,7724.41
PGND on Top Layer "PGND_L01_P298" (solid, remove dead copper, pour order 298): 761.81,6937.01 1007.87,6937.01 1007.87,7281.5 761.81,7281.5
PGND on Top Layer "PGND_L01_P297" (solid, remove dead copper, pour order 297): 1057.09,6622.05 1470.47,6622.05 1470.47,6799.21 1057.09,6799.21
PGND on Top Layer "PGND_L01_P296" (solid, remove dead copper, pour order 296): 39 vertices, not listed, extent 33.46,2409.45 1352.36,7192.91
PGND on Top Layer "PGND_L01_P293" (solid, remove dead copper, pour order 293): 309.06,7724.41 820.87,7724.41 820.87,7970.47 309.06,7970.47
PGND on Top Layer "PGND_L01_P292" (solid, remove dead copper, pour order 292): 505.91,7970.47 820.87,7970.47 820.87,8078.74 505.91,8078.74
PGND on Top Layer "PGND_L01_P291" (solid, remove dead copper, pour order 291): 33.46,7192.91 309.06,7192.91 309.06,7931.1 33.46,7931.1
PGND on Top Layer "PGND_L01_P287" (solid, remove dead copper, pour order 287): 3753.94,6248.03 3960.63,6248.03 3960.63,6267.72 3753.94,6267.72
PGND on Top Layer "PGND_L01_P286" (solid, remove dead copper, pour order 286): 2937.01,6169.29 4118.11,6169.29 4118.11,6248.03 2937.01,6248.03
PGND on Top Layer "PGND_L01_P282" (solid, remove dead copper, pour order 282): 3960.63,6179.13 4118.11,6179.13 4118.11,6415.35 3960.63,6415.35
PGND on Top Layer "PGND_L01_P281" (solid, remove dead copper, pour order 281): 3980.32,6336.61 4118.11,6336.61 4118.11,6405.51 3980.32,6405.51
PGND on Top Layer "PGND_L01_P280" (solid, remove dead copper, pour order 280): 3753.94,6267.72 4118.11,6267.72 4118.11,6336.61 3753.94,6336.61
PGND on Top Layer "PGND_L01_P279" (solid, remove dead copper, pour order 279): 2297.24,6257.87 2523.62,6257.87 2523.62,6316.93 2297.24,6316.93
PGND on Top Layer "PGND_L01_P278" (solid, remove dead copper, pour order 278): 2523.62,6257.87 2809.06,6257.87 2809.06,6405.51 2523.62,6405.51
PGND on Top Layer "PGND_L01_P276" (solid, remove dead copper, pour order 276): 1470.47,6169.29 2809.06,6169.29 2809.06,6257.87 1470.47,6257.87
PGND on Top Layer "PGND_L01_P274" (solid, remove dead copper, pour order 274): 545.28,5096.46 683.07,5234.25 545.28,5234.25
PGND on Top Layer "PGND_L01_P273" (solid, remove dead copper, pour order 273): 732.28,5677.17 840.55,5785.43 840.55,5677.17
PGND on Top Layer "PGND_L01_P272" (solid, remove dead copper, pour order 272): 564.96,5716.54 604.33,5677.17 564.96,5677.17
PGND on Top Layer "PGND_L01_P271" (solid, remove dead copper, pour order 271): 535.43,5234.25 850.39,5234.25 850.39,5362.2 535.43,5362.2
PGND on Top Layer "PGND_L01_P270" (solid, remove dead copper, pour order 270): 564.96,5913.39 673.23,6021.65 564.96,6021.65
PGND on Top Layer "PGND_L01_P269" (solid, remove dead copper, pour order 269): 545.28,6366.14 633.86,6277.56 545.28,6277.56
PGND on Top Layer "PGND_L01_P268" (solid, remove dead copper, pour order 268): 545.28,6484.25 614.17,6553.15 545.28,6553.15
PGND on Top Layer "PGND_L01_P267" (solid, remove dead copper, pour order 267): 466.54,6562.99 574.8,6671.26 574.8,6562.99
PGND on Top Layer "PGND_L01_P266" (solid, remove dead copper, pour order 266): 456.69,6917.32 574.8,6799.21 574.8,6917.32
PGND on Top Layer "PGND_L01_P265" (solid, remove dead copper, pour order 265): 535.43,6996.06 594.49,6937.01 535.43,6937.01
PGND on Top Layer "PGND_L01_P264" (solid, remove dead copper, pour order 264): 2139.76,3078.74 1667.32,3078.74 1667.32,3275.59 2041.34,3275.59 2041.34,4555.12 1431.1,4555.12 1431.1,4653.54 2139.76,4653.54
PGND on Top Layer "PGND_L01_P258" (solid, remove dead copper, pour order 258): 250,4653.54 348.43,4751.97 250,4751.97
PGND on Top Layer "PGND_L01_P256" (solid, remove dead copper, pour order 256): 1057.09,6120.08 1470.47,6120.08 1470.47,6612.2 1057.09,6612.2
PGND on Top Layer "PGND_L01_P252" (solid, remove dead copper, pour order 252): 2848.43,2468.5 3143.7,2468.5 3143.7,2704.72 2848.43,2704.72
PGND on Top Layer "PGND_L01_P251" (solid, remove dead copper, pour order 251): 1273.62,2409.45 3143.7,2409.45 3143.7,2468.5 1273.62,2468.5
PGND on Top Layer "PGND_L01_P249" (solid, remove dead copper, pour order 249): 1667.32,2468.5 2238.19,2468.5 2238.19,2527.56 1667.32,2527.56
PGND on Top Layer "PGND_L01_P239" (solid, remove dead copper, pour order 239): 4561.02,4299.21 4305.12,4299.21 4305.12,3925.2 3773.62,3925.2 3773.62,4456.69 4561.02,4456.69
PGND on Top Layer "PGND_L01_P238" (solid, remove dead copper, pour order 238): 4561.02,3531.5 4442.91,3531.5 4442.91,3787.4 3773.62,3787.4 3773.62,3925.2 4305.12,3925.2 4305.12,3846.46 4561.02,3846.46
PGND on Top Layer "PGND_L01_P232" (solid, remove dead copper, pour order 232): 1470.47,6120.08 1913.39,6120.08 1913.39,6169.29 1470.47,6169.29
PGND on Top Layer "PGND_L01_P231" (solid, remove dead copper, pour order 231): 2228.35,5066.93 2562.99,5066.93 2562.99,5431.1 2228.35,5431.1
PGND on Top Layer "PGND_L01_P228" (solid, remove dead copper, pour order 228): 1057.09,5962.6 1106.3,5962.6 1106.3,6120.08 1057.09,6120.08
PGND on Top Layer "PGND_L01_P227" (solid, remove dead copper, pour order 227): 2287.4,5431.1 2562.99,5431.1 2562.99,5755.91 2287.4,5755.91
PGND on Top Layer "PGND_L01_P226" (solid, remove dead copper, pour order 226): 1913.39,5490.16 2120.08,5490.16 2120.08,5755.91 1913.39,5755.91
PGND on Top Layer "PGND_L01_P225" (solid, remove dead copper, pour order 225): 1431.1,4653.54 1598.43,4653.54 1598.43,4919.29 1431.1,4919.29
PGND on Top Layer "PGND_L01_P224" (solid, remove dead copper, pour order 224): 1362.2,4791.34 1431.1,4791.34 1431.1,4919.29 1362.2,4919.29
PGND on Top Layer "PGND_L01_P223" (solid, remove dead copper, pour order 223): 2139.76,3078.74 2671.26,3078.74 2671.26,3196.85 2139.76,3196.85
PGND on Top Layer "PGND_L01_P222" (solid, remove dead copper, pour order 222): 1312.99,4791.34 1381.89,4791.34 1381.89,5657.48 1312.99,5657.48
PGND on Top Layer "PGND_L01_P221" (solid, remove dead copper, pour order 221): 4334.65,3787.4 4442.91,3679.13 4442.91,3787.4
PGND on Top Layer "PGND_L01_P220" (solid, remove dead copper, pour order 220): 1204.72,4791.34 1244.09,4791.34 1244.09,5293.31 1204.72,5293.31
PGND on Top Layer "PGND_L01_P219" (solid, remove dead copper, pour order 219): 1244.09,4791.34 1312.99,4791.34 1312.99,5490.16 1244.09,5490.16
PGND on Top Layer "PGND_L01_P218" (solid, remove dead copper, pour order 218): 1293.31,5657.48 1312.99,5637.8 1312.99,5657.48
PGND on Top Layer "PGND_L01_P217" (solid, remove dead copper, pour order 217): 2937.01,5755.91 1687.01,5755.91 1687.01,5893.7 1509.84,5893.7 1509.84,5657.48 1106.3,5657.48 1106.3,6120.08 1913.39,6120.08 1913.39,5844.49 2809.06,5844.49 2809.06,6120.08 2937.01,6120.08
PGND on Top Layer "PGND_L01_P216" (solid, remove dead copper, pour order 216): 1381.89,5529.53 1509.84,5657.48 1381.89,5657.48
PGND on Top Layer "PGND_L01_P214" (solid, remove dead copper, pour order 214): 3291.34,5913.39 4118.11,5913.39 4118.11,6218.5 3291.34,6218.5
PGND on Top Layer "PGND_L01_P208" (solid, remove dead copper, pour order 208): 3281.5,6868.11 3360.24,6868.11 3360.24,6966.54 3281.5,6966.54
PGND on Top Layer "PGND_L01_P203" (solid, remove dead copper, pour order 203): 2809.06,6120.08 2937.01,6120.08 2937.01,7005.91 2809.06,7005.91
PGND on Top Layer "PGND_L01_P202" (solid, remove dead copper, pour order 202): 2937.01,6848.43 3094.49,6848.43 3094.49,7005.91 2937.01,7005.91
PGND on Top Layer "PGND_L01_P197" (solid, remove dead copper, pour order 197): 19 vertices, not listed, extent 43.31,6799.21 1372.05,9446.85
PGND on Top Layer "PGND_L01_P189" (solid, remove dead copper, pour order 189): 33.46,9397.64 574.8,9397.64 574.8,9427.17 33.46,9427.17
$2N2408 on Top Layer "$2N2408_L01_P174" (solid, remove dead copper, pour order 174): 2297.24,6385.83 2444.88,6385.83 2444.88,6612.2 2297.24,6612.2
$2N2408 on Top Layer "$2N2408_L01_P172" (solid, remove dead copper, pour order 172): 2996.06,5706.69 3862.2,5706.69 3862.2,5834.65 2996.06,5834.65
$2N2408 on Top Layer "$2N2408_L01_P171" (solid, remove dead copper, pour order 171): 3734.25,6622.05 3842.52,6622.05 3842.52,6779.53 3734.25,6779.53
$2N2408 on Top Layer "$2N2408_L01_P160" (solid, remove dead copper, pour order 160): 3734.25,6622.05 3753.94,6602.36 3753.94,6622.05
$2N2408 on Top Layer "$2N2408_L01_P159" (solid, remove dead copper, pour order 159): 3901.57,6395.67 3753.94,6395.67 3753.94,6622.05 3842.52,6622.05 3901.57,6562.99
U_TS on Top Layer "U_TS_L01_P157" (solid, remove dead copper, pour order 157): 6175.2,5893.7 5938.98,5893.7 5761.81,6070.87 6175.2,6070.87
U_TS on Top Layer "U_TS_L01_P153" (solid, remove dead copper, pour order 153): 6175.2,5637.8 6332.68,5637.8 6332.68,6070.87 6175.2,6070.87
U_TS on Top Layer "U_TS_L01_P152" (solid, remove dead copper, pour order 152): 5761.81,6070.87 5919.29,6070.87 5919.29,6307.09 5761.81,6307.09
U_Fin on Top Layer "U_FIN_L01_P145" (solid, remove dead copper, pour order 145): 5919.29,6464.57 6135.83,6464.57 6135.83,6779.53 5919.29,6779.53
U_Fin on Top Layer "U_FIN_L01_P144" (solid, remove dead copper, pour order 144): 6135.83,6661.42 6293.31,6661.42 6293.31,6976.38 6135.83,6976.38
U_Fin on Top Layer "U_FIN_L01_P143" (solid, remove dead copper, pour order 143): 5919.29,6346.46 5761.81,6346.46 5761.81,6681.1 5860.24,6779.53 5919.29,6779.53
~U_TS on Top Layer "~U_TS_L01_P136" (solid, remove dead copper, pour order 136): 6529.53,5637.8 6687.01,5637.8 6687.01,6287.4 6529.53,6287.4
~U_Fin on Top Layer "~U_FIN_L01_P132" (solid, remove dead copper, pour order 132): 6509.84,6464.57 6687.01,6464.57 6687.01,7212.6 6509.84,7212.6
+U_POWER on Top Layer "+U_POWER_L01_P122" (solid, remove dead copper, pour order 122): 1273.62,4003.94 1844.49,4003.94 1844.49,4338.58 1273.62,4338.58
$6N134 on Top Layer "$6N134_L01_P116" (solid, remove dead copper, pour order 116): 1372.05,2744.09 879.92,2744.09 879.92,3393.7 1017.72,3393.7 1017.72,2842.52 1372.05,2842.52
$6N134 on Top Layer "$6N134_L01_P115" (solid, remove dead copper, pour order 115): 860.24,3866.14 998.03,3866.14 998.03,4102.36 860.24,4102.36
$6N135 on Top Layer "$6N135_L01_P103" (solid, remove dead copper, pour order 103): 4275.59,4525.59 2966.54,4525.59 2425.2,3984.25 2425.2,3708.66 2336.61,3708.66 2336.61,4003.94 2927.17,4594.49 4275.59,4594.49
$6N135 on Top Layer "$6N135_L01_P100" (solid, remove dead copper, pour order 100): 663.39,3492.13 781.5,3610.24 781.5,3492.13
$6N135 on Top Layer "$6N135_L01_P094" (solid, remove dead copper, pour order 94): 1175.2,3472.44 1844.49,3472.44 1844.49,3846.46 1175.2,3846.46
$6N135 on Top Layer "$6N135_L01_P093" (solid, remove dead copper, pour order 93): 801.18,2566.93 545.28,2566.93 545.28,3059.06 663.39,3059.06 663.39,3492.13 801.18,3492.13
$6N135 on Top Layer "$6N135_L01_P092" (solid, remove dead copper, pour order 92): 545.28,3059.06 663.39,3177.17 663.39,3059.06
$6N135 on Top Layer "$6N135_L01_P089" (solid, remove dead copper, pour order 89): 1175.2,3472.44 781.5,3472.44 781.5,3748.03 1057.09,3748.03 1057.09,4181.1 801.18,4181.1 801.18,4338.58 722.44,4417.32 722.44,4811.02 879.92,4811.02 879.92,4712.6 811.02,4712.6 811.02,4476.38 1175.2,4476.38
$6N135 on Top Layer "$6N135_L01_P088" (solid, remove dead copper, pour order 88): 4580.71,5411.42 4423.23,5411.42 4423.23,5263.78 4374.02,5263.78 4374.02,5431.1 4462.6,5519.69 4580.71,5519.69
$6N135 on Top Layer "$6N135_L01_P086" (solid, remove dead copper, pour order 86): 4423.23,5194.88 4324.8,5194.88 4324.8,4525.59 4275.59,4525.59 4275.59,5263.78 4423.23,5263.78
$6N3156 on Top Layer "$6N3156_L01_P083" (solid, remove dead copper, pour order 83): 3616.14,3885.83 2927.17,3885.83 2927.17,3059.06 2966.54,3059.06 2966.54,2881.89 2750,2881.89 2750,3915.35 3074.8,4240.16 3616.14,4240.16
$6N3156 on Top Layer "$6N3156_L01_P072" (solid, remove dead copper, pour order 72): 2927.17,3059.06 3734.25,3059.06 3734.25,3137.8 2927.17,3137.8
$6N3156 on Top Layer "$6N3156_L01_P071" (solid, remove dead copper, pour order 71): 3517.72,2783.46 3734.25,2783.46 3734.25,3059.06 3517.72,3059.06
$6N106 on Top Layer "$6N106_L01_P061" (solid, remove dead copper, pour order 61): 1411.42,2842.52 1923.23,2842.52 1923.23,3000 1411.42,3000
$6N106 on Top Layer "$6N106_L01_P059" (solid, remove dead copper, pour order 59): 3399.61,2783.46 2730.32,2783.46 2730.32,2566.93 2356.3,2566.93 2356.3,2990.16 2651.57,2990.16 2651.57,2822.83 3124.02,2822.83 3124.02,3000 3399.61,3000
$6N106 on Top Layer "$6N106_L01_P058" (solid, remove dead copper, pour order 58): 1982.28,3334.65 1608.27,3334.65 1608.27,3000 1431.1,3000 1431.1,3393.7 1903.54,3393.7 1903.54,4417.32 1253.94,4417.32 1253.94,4564.96 948.82,4564.96 948.82,4712.6 1352.36,4712.6 1352.36,4476.38 1982.28,4476.38
$6N3315 on Top Layer "$6N3315_L01_P049" (solid, remove dead copper, pour order 49): 21 vertices, not listed, extent 4364.17,3196.85 4718.5,5401.57
+U_AMP on Top Layer "+U_AMP_L01_P045" (solid, remove dead copper, pour order 45): 6352.36,4614.17 6687.01,4614.17 6687.01,4751.97 6352.36,4751.97
+U_AMP on Top Layer "+U_AMP_L01_P041" (solid, remove dead copper, pour order 41): 6175.2,5362.2 6687.01,5362.2 6687.01,5480.31 6175.2,5480.31
$6N94 on Top Layer "$6N94_L01_P038" (solid, remove dead copper, pour order 38): 3812.99,2409.45 5072.83,2409.45 5072.83,2488.19 3812.99,2488.19
$6N94 on Top Layer "$6N94_L01_P037" (solid, remove dead copper, pour order 37): 3812.99,2488.19 4127.95,2488.19 4127.95,2763.78 3812.99,2763.78
$6N94 on Top Layer "$6N94_L01_P036" (solid, remove dead copper, pour order 36): 5564.96,2409.45 5072.83,2409.45 5072.83,3472.44 5427.17,3472.44 5427.17,3314.96 5564.96,3314.96
$6N94 on Top Layer "$6N94_L01_P033" (solid, remove dead copper, pour order 33): 4856.3,2881.89 5072.83,2881.89 5072.83,3472.44 4856.3,3472.44
$6N94 on Top Layer "$6N94_L01_P028" (solid, remove dead copper, pour order 28): 4127.95,2409.45 3812.99,2409.45 3812.99,3216.54 3025.59,3216.54 3025.59,3688.98 3616.14,3688.98 3616.14,3295.28 3911.42,3295.28 3911.42,2763.78 4127.95,2763.78
$6N101 on Top Layer "$6N101_L01_P025" (solid, remove dead copper, pour order 25): 5722.44,4673.23 5584.65,4535.43 5584.65,3669.29 5486.22,3669.29 5486.22,3590.55 4856.3,3590.55 4856.3,3925.2 5072.83,3925.2 5072.83,4555.12 5427.17,4555.12 5427.17,4771.65 5722.44,4771.65
$6N737 on Top Layer "$6N737_L01_P018" (solid, remove dead copper, pour order 18): 6687.01,2803.15 6293.31,2803.15 6293.31,2409.45 5742.13,2409.45 5742.13,3295.28 5879.92,3295.28 5879.92,3472.44 6687.01,3472.44
$6N737 on Top Layer "$6N737_L01_P013" (solid, remove dead copper, pour order 13): 4777.56,2566.93 4226.38,2566.93 4226.38,2842.52 3990.16,2842.52 3990.16,3374.02 3753.94,3374.02 3753.94,3629.92 4324.8,3629.92 4324.8,3374.02 4088.58,3374.02 4088.58,2980.32 4777.56,2980.32
-U_AMP on Top Layer "-U_AMP_L01_P009" (solid, remove dead copper, pour order 9): 5033.46,4692.91 5328.74,4692.91 5328.74,4889.76 5033.46,4889.76
-U_AMP on Top Layer "-U_AMP_L01_P007" (solid, remove dead copper, pour order 7): 5033.46,4889.76 5840.55,4889.76 5840.55,4968.5 5033.46,4968.5
-U_AMP on Top Layer "-U_AMP_L01_P006" (solid, remove dead copper, pour order 6): 6687.01,3590.55 5879.92,3590.55 5879.92,3669.29 5761.81,3669.29 5761.81,4437.01 5840.55,4515.75 5840.55,4968.5 6135.83,4968.5 6135.83,4515.75 6687.01,4515.75
-U_AMP on Top Layer "-U_AMP_L01_P005" (solid, remove dead copper, pour order 5): 6135.83,5145.67 6687.01,5145.67 6687.01,5263.78 6135.83,5263.78
-U_AMP on Top Layer "-U_AMP_L01_P004" (solid, remove dead copper, pour order 4): 6135.83,4515.75 6273.62,4515.75 6273.62,5145.67 6135.83,5145.67

## Other copper
Top Layer:
  pour cut-out: 151.57,6562.99 574.8,6562.99 574.8,6917.32 151.57,6917.32
  pour cut-out: 466.54,5962.6 584.65,6080.71 584.65,6179.13 466.54,6297.24 151.57,6297.24 151.57,5962.6
  pour cut-out: 564.96,5677.17 840.55,5677.17 840.55,6021.65 564.96,6021.65
  pour cut-out: 545.28,6277.56 781.5,6277.56 781.5,6553.15 545.28,6553.15
  text "T3-UM-1" at 3616.14,8924.02 h79.92
Mid Layer 1:
  pour cut-out: 5190.94,12114.17 6214.57,12114.17 6214.57,12330.71 5190.94,12330.71
  pour cut-out: 3803.15,12114.17 4836.61,12114.17 4836.61,12232.28 4728.35,12232.28 4728.35,12330.71 3803.15,12330.71
  pour cut-out: 4718.5,11750 4797.24,11750 4797.24,11848.43 4236.22,11848.43 4236.22,11661.42 4718.5,11661.42
  pour cut-out: 1411.42,8275.59 1657.48,8275.59 1657.48,8374.02 1559.06,8374.02 1559.06,8452.76 1500,8452.76 1500,8374.02 1411.42,8374.02
  pour cut-out: 2011.81,11031.5 2838.58,11031.5 2838.58,11307.09 2011.81,11307.09
  pour cut-out: 4295.28,7990.16 5358.27,7990.16 5358.27,8127.95 5220.47,8127.95 5220.47,8255.91 4295.28,8255.91
  pour cut-out: 2631.89,8324.8 2858.27,8324.8 2858.27,9377.95 2631.89,9377.95
  pour cut-out: 3379.92,7517.72 3596.46,7517.72 3596.46,7606.3 3379.92,7606.3
  pour cut-out: 1874.02,9683.07 2887.8,9683.07 2887.8,9801.18 2779.53,9801.18 2779.53,9909.45 1874.02,9909.45
  pour cut-out: 2435.04,7793.31 3468.5,7793.31 3468.5,7921.26 3350.39,7921.26 3350.39,8019.69 2435.04,8019.69
  pour cut-out: 2061.02,7419.29 2149.61,7419.29 2149.61,7537.4 2061.02,7537.4
  pour cut-out: 3340.55,10578.74 3360.24,10578.74 3360.24,10765.75 3340.55,10765.75
  pour cut-out: 1490.16,7340.55 1696.85,7340.55 1696.85,7458.66 1490.16,7458.66
  pour cut-out: 6125.98,9486.22 6559.06,9486.22 6559.06,9722.44 6007.87,9722.44 6007.87,9594.49 6125.98,9594.49
  pour cut-out: 4511.81,7379.92 5555.12,7379.92 5555.12,7498.03 5417.32,7498.03 5417.32,7625.98 4511.81,7625.98
  pour cut-out: 3507.87,7389.76 3596.46,7389.76 3596.46,7507.87 3507.87,7507.87
Mid Layer 2:
  pour cut-out: 3803.15,12114.17 4836.61,12114.17 4836.61,12232.28 4728.35,12232.28 4728.35,12330.71 3803.15,12330.71
  pour cut-out: 4718.5,11750 4797.24,11750 4797.24,11848.43 4236.22,11848.43 4236.22,11661.42 4718.5,11661.42
  pour cut-out: 5190.94,12114.17 6214.57,12114.17 6214.57,12330.71 5190.94,12330.71
  pour cut-out: 4295.28,7990.16 5358.27,7990.16 5358.27,8127.95 5220.47,8127.95 5220.47,8255.91 4295.28,8255.91
  pour cut-out: 2011.81,11031.5 2838.58,11031.5 2838.58,11307.09 2011.81,11307.09
  pour cut-out: 2435.04,7793.31 3468.5,7793.31 3468.5,7921.26 3350.39,7921.26 3350.39,8019.69 2435.04,8019.69
  pour cut-out: 6125.98,9486.22 6559.06,9486.22 6559.06,9722.44 6007.87,9722.44 6007.87,9594.49 6125.98,9594.49
  pour cut-out: 1874.02,9683.07 2887.8,9683.07 2887.8,9801.18 2779.53,9801.18 2779.53,9909.45 1874.02,9909.45
  pour cut-out: 1490.16,7340.55 1696.85,7340.55 1696.85,7458.66 1490.16,7458.66
  pour cut-out: 2631.89,8324.8 2858.27,8324.8 2858.27,9377.95 2631.89,9377.95
  pour cut-out: 1411.42,8275.59 1657.48,8275.59 1657.48,8374.02 1559.06,8374.02 1559.06,8452.76 1500,8452.76 1500,8374.02 1411.42,8374.02
  pour cut-out: 4511.81,7379.92 5555.12,7379.92 5555.12,7498.03 5417.32,7498.03 5417.32,7625.98 4511.81,7625.98
  pour cut-out: 3340.55,10578.74 3360.24,10578.74 3360.24,10765.75 3340.55,10765.75

## Silkscreen, mask and mechanical layers (free items; w line width, h text height)
Top Overlay:
  text "A2_PS" at 6359.06,11924.02 h39.37
  text "A1_PS" at 6337.88,11657.48 h31.5 r270
  text "A0_PS" at 6407.09,11420.47 h31.5
  text "W" at 6434.65,11130.71 h39.37
  text "ON/OFF_MC" at 5201.97,10968.5 h39.37
  text "OUT_GEN_F" at 3740.94,10629.53 h39.37 r270
  text "R" at 6558.27,10560.24 h39.37
  text "GEN_F" at 3499.21,10260.63 h39.37 r270
  text "BLOCING_Z" at 5534.65,10105.12 h39.37
  text "BLOCING_T" at 5540.16,9940.16 h39.37
  text "BLOCING_IP" at 5530.31,9689.37 h31.5
  text "T=100mC" at 4498.82,9476.77 h39.37 r270
  text "BLOCING_IS" at 5532.28,9475.59 h31.5
  text "GEN_EN" at 3534.25,9396.85 h39.37 r270
  text "T=1/2" at 4142.13,9350.39 h39.37 r270
  text "Tmin" at 3770.87,9343.7 h39.37 r270
  text "Tmax" at 4836.22,9330.71 h39.37 r270
  text "BLOCING_AMP" at 5212.2,9010.63 h31.5
  text "GEN_EN" at 2137.8,8759.45 h39.37
  text "GEN_F" at 2218.9,8189.76 h39.37
  text "SY_FLT" at 1136.22,7902.36 h39.37
  text "FLT_CLR" at 1106.69,7631.1 h39.37
  text "FAULT/SD" at 1355.12,7235.04 h39.37
Top Assembly:
  lines w0: 1057.09,3059.06 1057.09,3334.65 1332.68,3334.65 1332.68,3059.06 1057.09,3059.06 ; 1057.09,3059.06 1057.09,6405.51 ; 1057.09,3059.06 4403.54,3059.06 ; 1057.09,6405.51 1057.09,6129.92 1332.68,6129.92 1332.68,6405.51 1057.09,6405.51 ; 1057.09,6405.51 4403.54,6405.51 ; 4403.54,3059.06 4403.54,3334.65 4127.95,3334.65 4127.95,3059.06 4403.54,3059.06 ; 4403.54,3059.06 4403.54,6405.51 ; 4403.54,6405.51 4127.95,6405.51 4127.95,6129.92 4403.54,6129.92 4403.54,6405.51